# Altium PCB 1SL1 Xilinx Spartan-11E PQ208.PcbDoc (part 5 of 5)
Units mil, origin at the board's own origin, x right, y up, seen from the top; angles counter-clockwise.
Board outline 7086.61 x 1988.19 mil, 2 copper layers (Top Layer, Bottom Layer), stack 29.698 mil thick; 115 components, 126 nets, 642 pads, 225 vias.
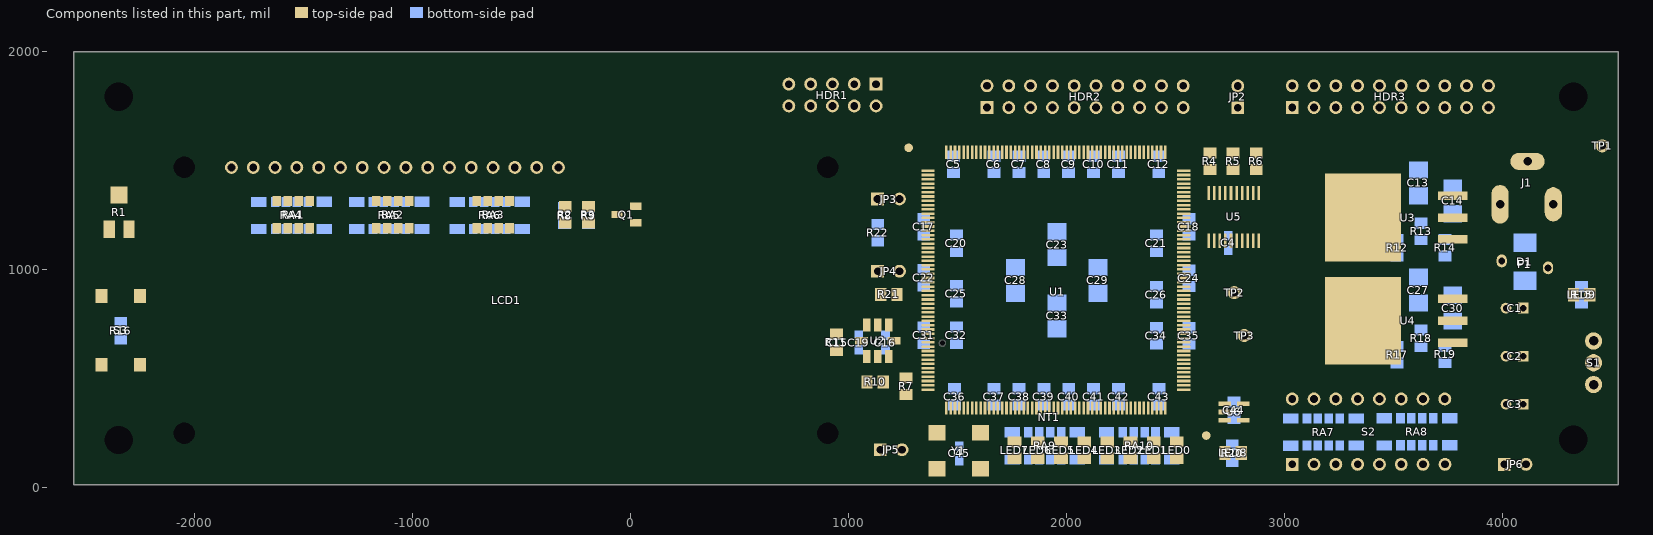
[diagram p4: the components of this part, seen from the top]

## Silkscreen, mask and mechanical layers (free items; w line width, h text height) (continued)
23_CONTINUATION_BLOCK:
  region: -5050,1550 -5120,1550 -5120,1500
  region: -5050,1550 -5120,1550 -5120,1600
  region: 9550,1550 9620,1550 9620,1600
  region: 9550,1550 9620,1550 9620,1500
  region: 2250,-3000 2250,-3070 2300,-3070
  region: 2250,-3000 2250,-3070 2200,-3070
  region: 2250,6100 2250,6170 2200,6170
  region: 2250,6100 2250,6170 2300,6170
  lines w5: -5250,-825 -5050,-825 ; -5250,1550 -5050,1550 ; -5250,3925 -5050,3925 ; -2750,-3200 -2750,-3000 ; -2750,6100 -2750,6300 ; -250,-3200 -250,-3000 ; -250,6100 -250,6300 ; 2250,-3200 2250,-3000 ; 2250,6100 2250,6300 ; 4750,-3200 4750,-3000 ; 4750,6100 4750,6300 ; 5050,-3000 9550,-3000 ; 5755,5575 9548,5575 ; 5755,5705 9548,5705 ; 5755,5835 9548,5835 ; 5755,5965 9548,5965 ; 5755,6095 5755,5445 9548,5445 ; 6055,5445 6055,5965 ; 6140,6100 6140,6249 7250,6249 7250,6100 7250,6300 ; 6355,5445 6355,5965 ; 6445,-3000 6445,-2850 ; 6750,-2850 6750,-2535 ; 7050,-3000 7050,-2850 ; 7140,6100 7140,6249 ; 7250,-3200 7250,-3000 ; 7750,-2850 7750,-2535 ; 8355,5445 8355,5965 ; 8790,-3000.1 8790,-2850.1 ; 8955,5445 8955,5965 ; 9250,-2850 9250,-2535 ; 9550,-2850 6445,-2850 ; 9550,-2535 6445,-2535 6445,-2850 ; 9550,-1800 9550,-3000 ; 9550,-1420 9699,-1420 9699,-310 9550,-310 ; 9550,-1310 9699,-1310 ; 9550,1550 9750,1550 ; 9550,3925 9750,3925 ; 9699,-825 9750,-825 ; -5050,-3000 -5050,-2804 -2173,-2804 -2173,-3000 -5050,-3000 ; -5050,-3000 9550,-3000 ; -5050,-3000 -5050,6100 ; -5050,6100 -5050,5770 -2990,5770 -2990,6100 -5050,6100 ; -5050,6100 9550,6100 9550,-3000 ; -5250,-3200 9750,-3200 9750,6300 -5250,6300 -5250,-3200
  text "DWG. NO." at 6155.1,6215 h30
  text "REV:" at 7165.1,6215 h30
  text "1" at -4018.66,6170 h70
  text "2" at -1523,6170 h70
  text "3" at 966.34,6170 h70
  text "4" at 3473.01,6170 h70
  text "5" at 5972,6170 h70
  text "6" at 8477,6170 h70
  text ".PCB_DWG_NO" at 6370,6125 h50
  text ".PCB_REV" at 7180,6125 h50
  text "T" at -5038,6027.61 h76
  text "H" at -4994.66,6027.61 h76
  text "I" at -4944.64,6027.61 h76
  text "S" at -4924.64,6027.61 h76
  text "D" at -4859.62,6027.61 h76
  text "O" at -4809.61,6027.61 h76
  text "C" at -4754.6,6027.61 h76
  text "U" at -4704.59,6027.61 h76
  text "M" at -4654.57,6027.61 h76
  text "E" at -4596.23,6027.61 h76
  text "N" at -4549.55,6027.61 h76
  text "T" at -4501.2,6027.61 h76
  text "A" at -4437.85,6027.61 h76
  text "N" at -4391.17,6027.61 h76
  text "D" at -4341.16,6027.61 h76
  text "T" at -4272.81,6027.61 h76
  text "H" at -4229.47,6027.61 h76
  text "E" at -4179.46,6027.61 h76
  text "D" at -4114.44,6027.61 h76
  text "A" at -4064.43,6027.61 h76
  text "T" at -4017.75,6027.61 h76
  text "A" at -3976.07,6027.61 h76
  text "D" at -3909.39,6027.61 h76
  text "I" at -3859.38,6027.61 h76
  text "S" at -3841.04,6027.61 h76
  text "C" at -3794.36,6027.61 h76
  text "L" at -3744.35,6027.61 h76
  text "O" at -3706.01,6027.61 h76
  text "S" at -3650.99,6027.61 h76
  text "E" at -3604.31,6027.61 h76
  text "D" at -3557.64,6027.61 h76
  text "H" at -3489.29,6027.61 h76
  text "E" at -3439.27,6027.61 h76
  text "R" at -3392.6,6027.61 h76
  text "E" at -3344.25,6027.61 h76
  text "I" at -3297.57,6027.61 h76
  text "N" at -3277.57,6027.61 h76
  text "O" at -3209.22,6027.61 h76
  text "R" at -3154.2,6027.61 h76
  text "REVISIONS" at 7390,5995 h60
  text "H" at -5038,5947.59 h76
  text "E" at -4987.99,5947.59 h76
  text "R" at -4941.31,5947.59 h76
  text "E" at -4891.3,5947.59 h76
  text "W" at -4846.29,5947.59 h76
  text "I" at -4777.94,5947.59 h76
  text "T" at -4759.6,5947.59 h76
  text "H" at -4716.25,5947.59 h76
  text "I" at -4647.9,5947.59 h76
  text "S" at -4627.9,5947.59 h76
  text "T" at -4562.88,5947.59 h76
  text "H" at -4519.54,5947.59 h76
  text "E" at -4469.53,5947.59 h76
  text "P" at -4404.51,5947.59 h76
  text "R" at -4357.83,5947.59 h76
  text "O" at -4307.82,5947.59 h76
  text "P" at -4253.77,5947.59 h76
  text "E" at -4207.1,5947.59 h76
  text "R" at -4160.42,5947.59 h76
  text "T" at -4112.07,5947.59 h76
  text "Y" at -4068.73,5947.59 h76
  text "O" at -4003.71,5947.59 h76
  text "F" at -3950.37,5947.59 h76
  text "A" at -3887.02,5947.59 h76
  text "L" at -3840.34,5947.59 h76
  text "T" at -3803.66,5947.59 h76
  text "I" at -3760.32,5947.59 h76
  text "U" at -3740.31,5947.59 h76
  text "M" at -3690.3,5947.59 h76
  text "L" at -3613.62,5947.59 h76
  text "I" at -3575.27,5947.59 h76
  text "M" at -3555.27,5947.59 h76
  text "I" at -3498.59,5947.59 h76
  text "T" at -3478.58,5947.59 h76
  text "E" at -3435.24,5947.59 h76
  text "D" at -3388.56,5947.59 h76
  text "A" at -3320.21,5947.59 h76
  text "N" at -3273.53,5947.59 h76
  text "D" at -3223.52,5947.59 h76
  text "M" at -3153.5,5947.59 h76
  text "A" at -3095.15,5947.59 h76
  text "Y" at -3050.14,5947.59 h76
  text "ZONE" at 5805,5870 h60
  text "REV" at 6135,5870 h60
  text "DATE" at 8555,5870 h60
  text "B" at -5038,5867.57 h76
  text "E" at -4991.32,5867.57 h76
  text "F" at -4924.64,5867.57 h76
  text "R" at -4881.3,5867.57 h76
  text "E" at -4831.28,5867.57 h76
  text "E" at -4786.27,5867.57 h76
  text "L" at -4739.59,5867.57 h76
  text "Y" at -4701.25,5867.57 h76
  text "D" at -4634.57,5867.57 h76
  text "I" at -4584.56,5867.57 h76
  text "S" at -4566.22,5867.57 h76
  text "T" at -4519.54,5867.57 h76
  text "R" at -4476.89,5867.57 h76
  text "I" at -4428.54,5867.57 h76
  text "B" at -4408.54,5867.57 h76
  text "U" at -4361.86,5867.57 h76
  text "T" at -4311.85,5867.57 h76
  text "E" at -4268.5,5867.57 h76
  text "D" at -4221.82,5867.57 h76
  text "I" at -4153.47,5867.57 h76
  text "N" at -4133.47,5867.57 h76
  text "W" at -4066.79,5867.57 h76
  text "H" at -3998.44,5867.57 h76
  text "O" at -3950.09,5867.57 h76
  text "L" at -3895.08,5867.57 h76
  text "E" at -3856.73,5867.57 h76
  text "." at -3810.06,5867.57 h76
  text "N" at -3771.71,5867.57 h76
  text "O" at -3721.7,5867.57 h76
  text "R" at -3646.68,5867.57 h76
  text "I" at -3598.34,5867.57 h76
  text "G" at -3578.33,5867.57 h76
  text "H" at -3523.32,5867.57 h76
  text "T" at -3474.97,5867.57 h76
  text "S" at -3431.63,5867.57 h76
  text "A" at -3366.61,5867.57 h76
  text "R" at -3319.94,5867.57 h76
  text "E" at -3269.92,5867.57 h76
  text "DESCRIPTION" at 7150,5865 h60
  text "APPROVED" at 9060,5865 h60
  text "R" at -5038,5787.55 h76
  text "E" at -4987.99,5787.55 h76
  text "S" at -4941.31,5787.55 h76
  text "E" at -4894.63,5787.55 h76
  text "R" at -4847.95,5787.55 h76
  text "V" at -4797.94,5787.55 h76
  text "E" at -4751.26,5787.55 h76
  text "D" at -4704.59,5787.55 h76
  text "O" at -4636.24,5787.55 h76
  text "R" at -4581.22,5787.55 h76
  text "E" at -4511.2,5787.55 h76
  text "X" at -4464.53,5787.55 h76
  text "P" at -4419.52,5787.55 h76
  text "R" at -4372.84,5787.55 h76
  text "E" at -4322.82,5787.55 h76
  text "S" at -4276.15,5787.55 h76
  text "S" at -4229.47,5787.55 h76
  text "O" at -4164.45,5787.55 h76
  text "R" at -4109.44,5787.55 h76
  text "I" at -4041.09,5787.55 h76
  text "M" at -4021.08,5787.55 h76
  text "P" at -3962.74,5787.55 h76
  text "L" at -3916.06,5787.55 h76
  text "I" at -3879.38,5787.55 h76
  text "E" at -3859.38,5787.55 h76
  text "D" at -3812.7,5787.55 h76
  text "W" at -3746.02,5787.55 h76
  text "A" at -3677.67,5787.55 h76
  text "R" at -3630.99,5787.55 h76
  text "A" at -3580.98,5787.55 h76
  text "N" at -3534.3,5787.55 h76
  text "T" at -3485.95,5787.55 h76
  text "E" at -3442.61,5787.55 h76
  text "E" at -3395.93,5787.55 h76
  text "G" at -3334.68,5787.55 h76
  text "I" at -3279.67,5787.55 h76
  text "V" at -3259.66,5787.55 h76
  text "E" at -3212.98,5787.55 h76
  text "N" at -3166.3,5787.55 h76
  text "." at -3117.96,5787.55 h76
  text "A" at 6165,5735 h60
  text "ORIGINAL" at 7225,5735 h60
  text "A" at -5175,5027 h70
  text "A" at 9625,5027 h70
  text "B" at -5175,2647 h70
  text "B" at 9625,2647 h70
  text "C" at -5175,272 h70
  text "C" at 9625,272 h70
  text "DWG. NO." at 9665,-325.1 h30 r270
  text ".PCB_DWG_NO" at 9575,-540 h50 r270
  text "REV:" at 9665,-1335.1 h30 r270
  text ".PCB_REV" at 9575,-1350 h50 r270
  text "D" at -5175,-2098 h70
  text "D" at 9625,-2098 h70
  text "SIZE:" at 6530,-2610 h45
  text "CAGE CODE:" at 6775,-2610 h45
  text "DWG NO:" at 7775,-2610 h45
  text "REV:" at 9335,-2610 h45
  text ".PCB_DWG_NO" at 8085,-2750 h100
  text "B" at 6570,-2755 h100
  text ".PCB_REV" at 9365,-2755 h100
  text ".CAGE_CODE" at 6945,-2765 h100
  text "SCALE:" at 6470,-2925 h45
  text "FILE NAME:" at 7075,-2925.1 h45
  text "SHEET:" at 8815,-2925.1 h45
  text ".Printout_Name" at -4994,-2947 h150
  text ".PCB_FILE_NAME_NO_PATH" at 7418,-2970.1 h60
  text ".PCB_SCALE" at 6740,-2975 h60
  text "OF" at 9265,-2975.1 h45
  text "DOC-104 REV A" at -5050,-3042.1 h20
  text "1" at -4018.66,-3130 h70
  text "2" at -1523,-3130 h70
  text "3" at 966.34,-3130 h70
  text "4" at 3473.01,-3130 h70
  text "5" at 5972,-3130 h70
  text "6" at 8477,-3130 h70
24_CONTINUATION_BLOCK_MIRRORED:
  region: 2250,6100 2250,6170 2200,6170
  region: 2250,6100 2250,6170 2300,6170
  region: 2250,-3000 2250,-3070 2300,-3070
  region: 2250,-3000 2250,-3070 2200,-3070
  region: -5050,1550 -5120,1550 -5120,1500
  region: -5050,1550 -5120,1550 -5120,1600
  region: 9550,1550 9620,1550 9620,1600
  region: 9550,1550 9620,1550 9620,1500
  lines w5: -5250,-825 -5199,-825 ; -5250,1550 -5050,1550 ; -5250,3925 -5050,3925 ; -5199,-1310 -5050,-1310 ; -5050,-2850 -1945,-2850 ; -5050,-2535 -1945,-2535 -1945,-2850 ; -5050,-1800 -5050,-3000 ; -5050,-1420 -5199,-1420 -5199,-310 -5050,-310 ; -5048,5445 -1255,5445 -1255,6095 ; -5048,5575 -1255,5575 ; -5048,5705 -1255,5705 ; -5048,5835 -1255,5835 ; -5048,5965 -1255,5965 ; -4750,-2850 -4750,-2535 ; -4455,5445 -4455,5965 ; -4290,-3000.1 -4290,-2850.1 ; -3855,5445 -3855,5965 ; -3250,-2850 -3250,-2535 ; -2750,-3200 -2750,-3000 ; -2750,6300 -2750,6100 -2750,6249 -1640,6249 -1640,6100 ; -2640,6100 -2640,6249 ; -2550,-3000 -2550,-2850 ; -2250,-2850 -2250,-2535 ; -1945,-3000 -1945,-2850 ; -1855,5445 -1855,5965 ; -1555,5445 -1555,5965 ; -550,-3000 -5050,-3000 ; -250,-3200 -250,-3000 ; -250,6100 -250,6300 ; 2250,-3200 2250,-3000 ; 2250,6100 2250,6300 ; 4750,-3200 4750,-3000 ; 4750,6100 4750,6300 ; 7250,-3200 7250,-3000 ; 7250,6100 7250,6300 ; 9550,-825 9750,-825 ; 9550,1550 9750,1550 ; 9550,3925 9750,3925 ; -5050,-3000 -5050,6100 9550,6100 ; -5050,-3000 9550,-3000 ; 9550,-3000 6673,-3000 6673,-2804 9550,-2804 9550,-3000 ; 9550,-3000 9550,6100 ; 9550,6100 9550,5770 7490,5770 7490,6100 9550,6100 ; -5250,-3200 -5250,6300 9750,6300 9750,-3200 -5250,-3200
  text "REV:" at -2665.1,6215 h30
  text "DWG. NO." at -1655.1,6215 h30
  text "6" at -3977,6170 h70
  text "5" at -1472,6170 h70
  text "4" at 1026.99,6170 h70
  text "3" at 3533.66,6170 h70
  text "2" at 6023,6170 h70
  text "1" at 8518.66,6170 h70
  text ".PCB_REV" at -2680,6125 h50
  text ".PCB_DWG_NO" at -1870,6125 h50
  text "R" at 7654.2,6027.61 h76
  text "O" at 7709.22,6027.61 h76
  text "N" at 7777.57,6027.61 h76
  text "I" at 7797.57,6027.61 h76
  text "E" at 7844.25,6027.61 h76
  text "R" at 7892.59,6027.61 h76
  text "E" at 7939.27,6027.61 h76
  text "H" at 7989.29,6027.61 h76
  text "D" at 8057.64,6027.61 h76
  text "E" at 8104.31,6027.61 h76
  text "S" at 8150.99,6027.61 h76
  text "O" at 8206.01,6027.61 h76
  text "L" at 8244.35,6027.61 h76
  text "C" at 8294.36,6027.61 h76
  text "S" at 8341.04,6027.61 h76
  text "I" at 8359.38,6027.61 h76
  text "D" at 8409.39,6027.61 h76
  text "A" at 8476.07,6027.61 h76
  text "T" at 8517.75,6027.61 h76
  text "A" at 8564.43,6027.61 h76
  text "D" at 8614.44,6027.61 h76
  text "E" at 8679.45,6027.61 h76
  text "H" at 8729.47,6027.61 h76
  text "T" at 8772.81,6027.61 h76
  text "D" at 8841.16,6027.61 h76
  text "N" at 8891.17,6027.61 h76
  text "A" at 8937.85,6027.61 h76
  text "T" at 9001.2,6027.61 h76
  text "N" at 9049.55,6027.61 h76
  text "E" at 9096.22,6027.61 h76
  text "M" at 9154.57,6027.61 h76
  text "U" at 9204.58,6027.61 h76
  text "C" at 9254.6,6027.61 h76
  text "O" at 9309.61,6027.61 h76
  text "D" at 9359.62,6027.61 h76
  text "S" at 9424.64,6027.61 h76
  text "I" at 9444.64,6027.61 h76
  text "H" at 9494.66,6027.61 h76
  text "T" at 9538,6027.61 h76
  text "REVISIONS" at -2890,5995 h60
  text "Y" at 7550.14,5947.59 h76
  text "A" at 7595.15,5947.59 h76
  text "M" at 7653.5,5947.59 h76
  text "D" at 7723.52,5947.59 h76
  text "N" at 7773.53,5947.59 h76
  text "A" at 7820.21,5947.59 h76
  text "D" at 7888.56,5947.59 h76
  text "E" at 7935.24,5947.59 h76
  text "T" at 7978.58,5947.59 h76
  text "I" at 7998.59,5947.59 h76
  text "M" at 8055.27,5947.59 h76
  text "I" at 8075.27,5947.59 h76
  text "L" at 8113.61,5947.59 h76
  text "M" at 8190.3,5947.59 h76
  text "U" at 8240.31,5947.59 h76
  text "I" at 8260.32,5947.59 h76
  text "T" at 8303.66,5947.59 h76
  text "L" at 8340.34,5947.59 h76
  text "A" at 8387.02,5947.59 h76
  text "F" at 8450.36,5947.59 h76
  text "O" at 8503.71,5947.59 h76
  text "Y" at 8568.73,5947.59 h76
  text "T" at 8612.07,5947.59 h76
  text "R" at 8660.42,5947.59 h76
  text "E" at 8707.09,5947.59 h76
  text "P" at 8753.77,5947.59 h76
  text "O" at 8807.82,5947.59 h76
  text "R" at 8857.83,5947.59 h76
  text "P" at 8904.51,5947.59 h76
  text "E" at 8969.53,5947.59 h76
  text "H" at 9019.54,5947.59 h76
  text "T" at 9062.88,5947.59 h76
  text "S" at 9127.9,5947.59 h76
  text "I" at 9147.9,5947.59 h76
  text "H" at 9216.25,5947.59 h76
  text "T" at 9259.6,5947.59 h76
  text "I" at 9277.94,5947.59 h76
  text "W" at 9346.29,5947.59 h76
  text "E" at 9391.3,5947.59 h76
  text "R" at 9441.31,5947.59 h76
  text "E" at 9487.99,5947.59 h76
  text "H" at 9538,5947.59 h76
  text "DATE" at -4055,5870 h60
  text "REV" at -1635,5870 h60
  text "ZONE" at -1305,5870 h60
  text "E" at 7769.92,5867.57 h76
  text "R" at 7819.93,5867.57 h76
  text "A" at 7866.61,5867.57 h76
  text "S" at 7931.63,5867.57 h76
  text "T" at 7974.97,5867.57 h76
  text "H" at 8023.32,5867.57 h76
  text "G" at 8078.33,5867.57 h76
  text "I" at 8098.34,5867.57 h76
  text "R" at 8146.68,5867.57 h76
  text "O" at 8221.7,5867.57 h76
  text "N" at 8271.71,5867.57 h76
  text "." at 8310.06,5867.57 h76
  text "E" at 8356.73,5867.57 h76
  text "L" at 8395.08,5867.57 h76
  text "O" at 8450.09,5867.57 h76
  text "H" at 8498.43,5867.57 h76
  text "W" at 8566.78,5867.57 h76
  text "N" at 8633.47,5867.57 h76
  text "I" at 8653.47,5867.57 h76
  text "D" at 8721.82,5867.57 h76
  text "E" at 8768.5,5867.57 h76
  text "T" at 8811.85,5867.57 h76
  text "U" at 8861.86,5867.57 h76
  text "B" at 8908.54,5867.57 h76
  text "I" at 8928.54,5867.57 h76
  text "R" at 8976.89,5867.57 h76
  text "T" at 9019.54,5867.57 h76
  text "S" at 9066.22,5867.57 h76
  text "I" at 9084.55,5867.57 h76
  text "D" at 9134.57,5867.57 h76
  text "Y" at 9201.25,5867.57 h76
  text "L" at 9239.59,5867.57 h76
  text "E" at 9286.27,5867.57 h76
  text "E" at 9331.28,5867.57 h76
  text "R" at 9381.29,5867.57 h76
  text "F" at 9424.64,5867.57 h76
  text "E" at 9491.32,5867.57 h76
  text "B" at 9538,5867.57 h76
  text "APPROVED" at -4560,5865 h60
  text "DESCRIPTION" at -2650,5865 h60
  text "." at 7617.96,5787.55 h76
  text "N" at 7666.3,5787.55 h76
  text "E" at 7712.98,5787.55 h76
  text "V" at 7759.66,5787.55 h76
  text "I" at 7779.66,5787.55 h76
  text "G" at 7834.68,5787.55 h76
  text "E" at 7895.93,5787.55 h76
  text "E" at 7942.61,5787.55 h76
  text "T" at 7985.95,5787.55 h76
  text "N" at 8034.3,5787.55 h76
  text "A" at 8080.97,5787.55 h76
  text "R" at 8130.99,5787.55 h76
  text "A" at 8177.66,5787.55 h76
  text "W" at 8246.01,5787.55 h76
  text "D" at 8312.7,5787.55 h76
  text "E" at 8359.38,5787.55 h76
  text "I" at 8379.38,5787.55 h76
  text "L" at 8416.06,5787.55 h76
  text "P" at 8462.74,5787.55 h76
  text "M" at 8521.08,5787.55 h76
  text "I" at 8541.09,5787.55 h76
  text "R" at 8609.44,5787.55 h76
  text "O" at 8664.45,5787.55 h76
  text "S" at 8729.47,5787.55 h76
  text "S" at 8776.15,5787.55 h76
  text "E" at 8822.82,5787.55 h76
  text "R" at 8872.84,5787.55 h76
  text "P" at 8919.51,5787.55 h76
  text "X" at 8964.53,5787.55 h76
  text "E" at 9011.2,5787.55 h76
  text "R" at 9081.22,5787.55 h76
  text "O" at 9136.23,5787.55 h76
  text "D" at 9204.58,5787.55 h76
  text "E" at 9251.26,5787.55 h76
  text "V" at 9297.94,5787.55 h76
  text "R" at 9347.95,5787.55 h76
  text "E" at 9394.63,5787.55 h76
  text "S" at 9441.31,5787.55 h76
  text "E" at 9487.99,5787.55 h76
  text "R" at 9538,5787.55 h76
  text "ORIGINAL" at -2725,5735 h60
  text "A" at -1665,5735 h60
  text "A" at -5125,5027 h70
  text "A" at 9675,5027 h70
  text "B" at -5125,2647 h70
  text "B" at 9675,2647 h70
  text "C" at -5125,272 h70
  text "C" at 9675,272 h70
  text "DWG. NO." at -5165,-325.1 h30 r90
  text ".PCB_DWG_NO" at -5075,-540 h50 r90
  text "REV:" at -5165,-1335.1 h30 r90
  text ".PCB_REV" at -5075,-1350 h50 r90
  text "D" at -5125,-2098 h70
  text "D" at 9675,-2098 h70
  text "REV:" at -4835,-2610 h45
  text "DWG NO:" at -3275,-2610 h45
  text "CAGE CODE:" at -2275,-2610 h45
  text "SIZE:" at -2030,-2610 h45
  text ".PCB_DWG_NO" at -3585,-2750 h100
  text ".PCB_REV" at -4865,-2755 h100
  text "B" at -2070,-2755 h100
  text ".CAGE_CODE" at -2445,-2765 h100
  text "SHEET:" at -4315,-2925.1 h45
  text "FILE NAME:" at -2575,-2925.1 h45
  text "SCALE:" at -1970,-2925 h45
  text ".Printout_Name" at 9494,-2947 h150
  text ".PCB_FILE_NAME_NO_PATH" at -2918,-2970.1 h60
  text "OF" at -4765,-2975.1 h45
  text ".PCB_SCALE" at -2240,-2975 h60
  text "DOC-104 REV A" at 9550,-3042.1 h20
  text "6" at -3977,-3130 h70
  text "5" at -1472,-3130 h70
  text "4" at 1026.99,-3130 h70
  text "3" at 3533.66,-3130 h70
  text "2" at 6023,-3130 h70
  text "1" at 8518.66,-3130 h70

## Dimensions
-2555.06,9.66 to 4531.55,9.66 on 2_DIMENSION

## Text inside footprints (layer, text, board x,y; h text height)
C1: Top Overlay "+" at 4211.43,850.78 h59.06 r180
C2: Top Overlay "+" at 4211.43,630.31 h59.06 r180
C3: Top Overlay "+" at 4211.43,409.83 h59.06 r180
HDR1: Top Overlay "2" at 1346.62,1722.62 h39.37; Top Overlay "1" at 1354.5,1828.92 h39.37; Top Overlay "9" at 656.15,1828.61 h39.37; Top Overlay "10" at 621.15,1728.61 h39.37
HDR2: Top Overlay "20" at 2555.05,1910.86 h39.37 r90; Top Overlay "19" at 2555.05,1610.86 h39.37 r90; Top Overlay "1" at 1655.05,1655.86 h39.37 r90; Top Overlay "2" at 1655.05,1910.86 h39.37 r90; Top Overlay "16" at 2355.05,1910.86 h39.37 r90; Top Overlay "12" at 2155.05,1910.86 h39.37 r90; Top Overlay "6" at 1855.05,1910.86 h39.37 r90; Top Overlay "15" at 2355.05,1610.86 h39.37 r90; Top Overlay "11" at 2155.05,1625.86 h39.37 r90; Top Overlay "5" at 1855.05,1645.86 h39.37 r90; Top Overlay "18" at 2455.05,1910.86 h39.37 r90; Top Overlay "17" at 2455.05,1610.86 h39.37 r90; Top Overlay "14" at 2255.05,1910.86 h39.37 r90; Top Overlay "13" at 2255.05,1610.86 h39.37 r90; Top Overlay "10" at 2055.05,1910.86 h39.37 r90; Top Overlay "9" at 2055.05,1645.86 h39.37 r90; Top Overlay "8" at 1955.05,1910.86 h39.37 r90; Top Overlay "7" at 1955.05,1645.86 h39.37 r90; Top Overlay "4" at 1755.05,1910.86 h39.37 r90; Top Overlay "3" at 1755.05,1645.86 h39.37 r90
HDR3: Top Overlay "20" at 3955.05,1910.86 h39.37 r90; Top Overlay "19" at 3955.05,1610.86 h39.37 r90; Top Overlay "1" at 3055.05,1655.86 h39.37 r90; Top Overlay "2" at 3055.05,1910.86 h39.37 r90; Top Overlay "16" at 3755.05,1910.86 h39.37 r90; Top Overlay "12" at 3555.05,1910.86 h39.37 r90; Top Overlay "6" at 3255.05,1910.86 h39.37 r90; Top Overlay "15" at 3755.05,1610.86 h39.37 r90; Top Overlay "11" at 3555.05,1625.86 h39.37 r90; Top Overlay "5" at 3255.05,1645.86 h39.37 r90; Top Overlay "18" at 3855.05,1910.86 h39.37 r90; Top Overlay "17" at 3855.05,1610.86 h39.37 r90; Top Overlay "14" at 3655.05,1910.86 h39.37 r90; Top Overlay "13" at 3655.05,1610.86 h39.37 r90; Top Overlay "10" at 3455.05,1910.86 h39.37 r90; Top Overlay "9" at 3455.05,1645.86 h39.37 r90; Top Overlay "8" at 3355.05,1910.86 h39.37 r90; Top Overlay "7" at 3355.05,1645.86 h39.37 r90; Top Overlay "4" at 3155.05,1910.86 h39.37 r90; Top Overlay "3" at 3155.05,1645.86 h39.37 r90
Logo5: Top Overlay "5V DC" at 4209.66,1522.24 h47.24
U3: Top Overlay "1" at 3876.68,1128.75 h31.5 r90; Top Overlay "3" at 3877.67,1324.61 h31.5 r90; Top Overlay "2" at 3876.17,1223.75 h31.5 r90
U4: Top Overlay "1" at 3876.68,655.52 h31.5 r90; Top Overlay "3" at 3877.67,851.39 h31.5 r90; Top Overlay "2" at 3876.17,750.53 h31.5 r90